# Altium PCB FPGA_Peripheral_Board.PcbDoc (part 1 of 5)
Units mm, origin at the board's own origin, x right, y up, seen from the top; angles counter-clockwise.
Board outline 78.8 x 69 mm, 4 copper layers (Top Layer, Int1 (GND), Int2 (PWR), Bottom Layer), stack 1.508 mm thick; 111 components, 280 nets, 1262 pads, 728 vias.
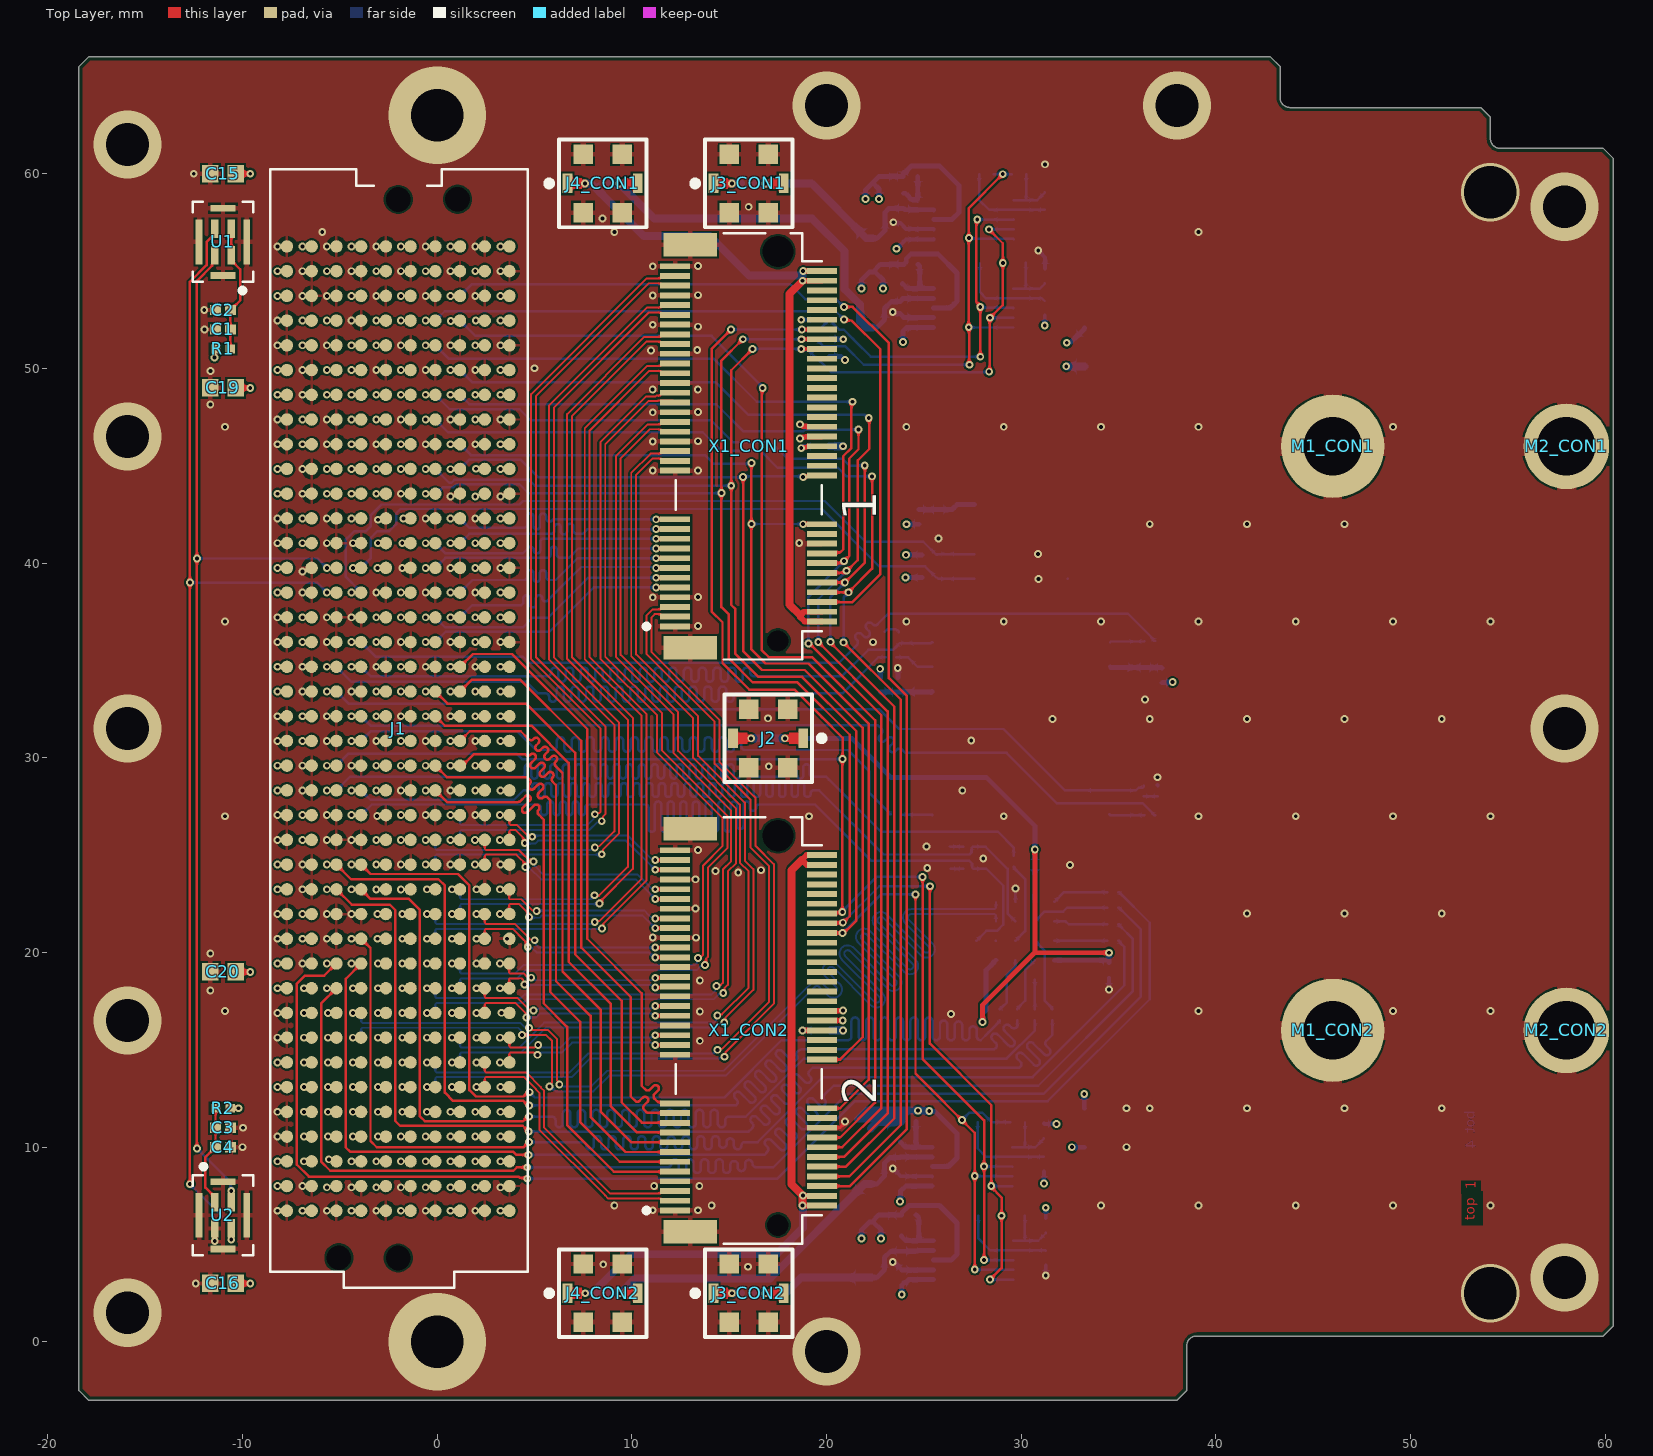
[diagram p0: Top Layer view]
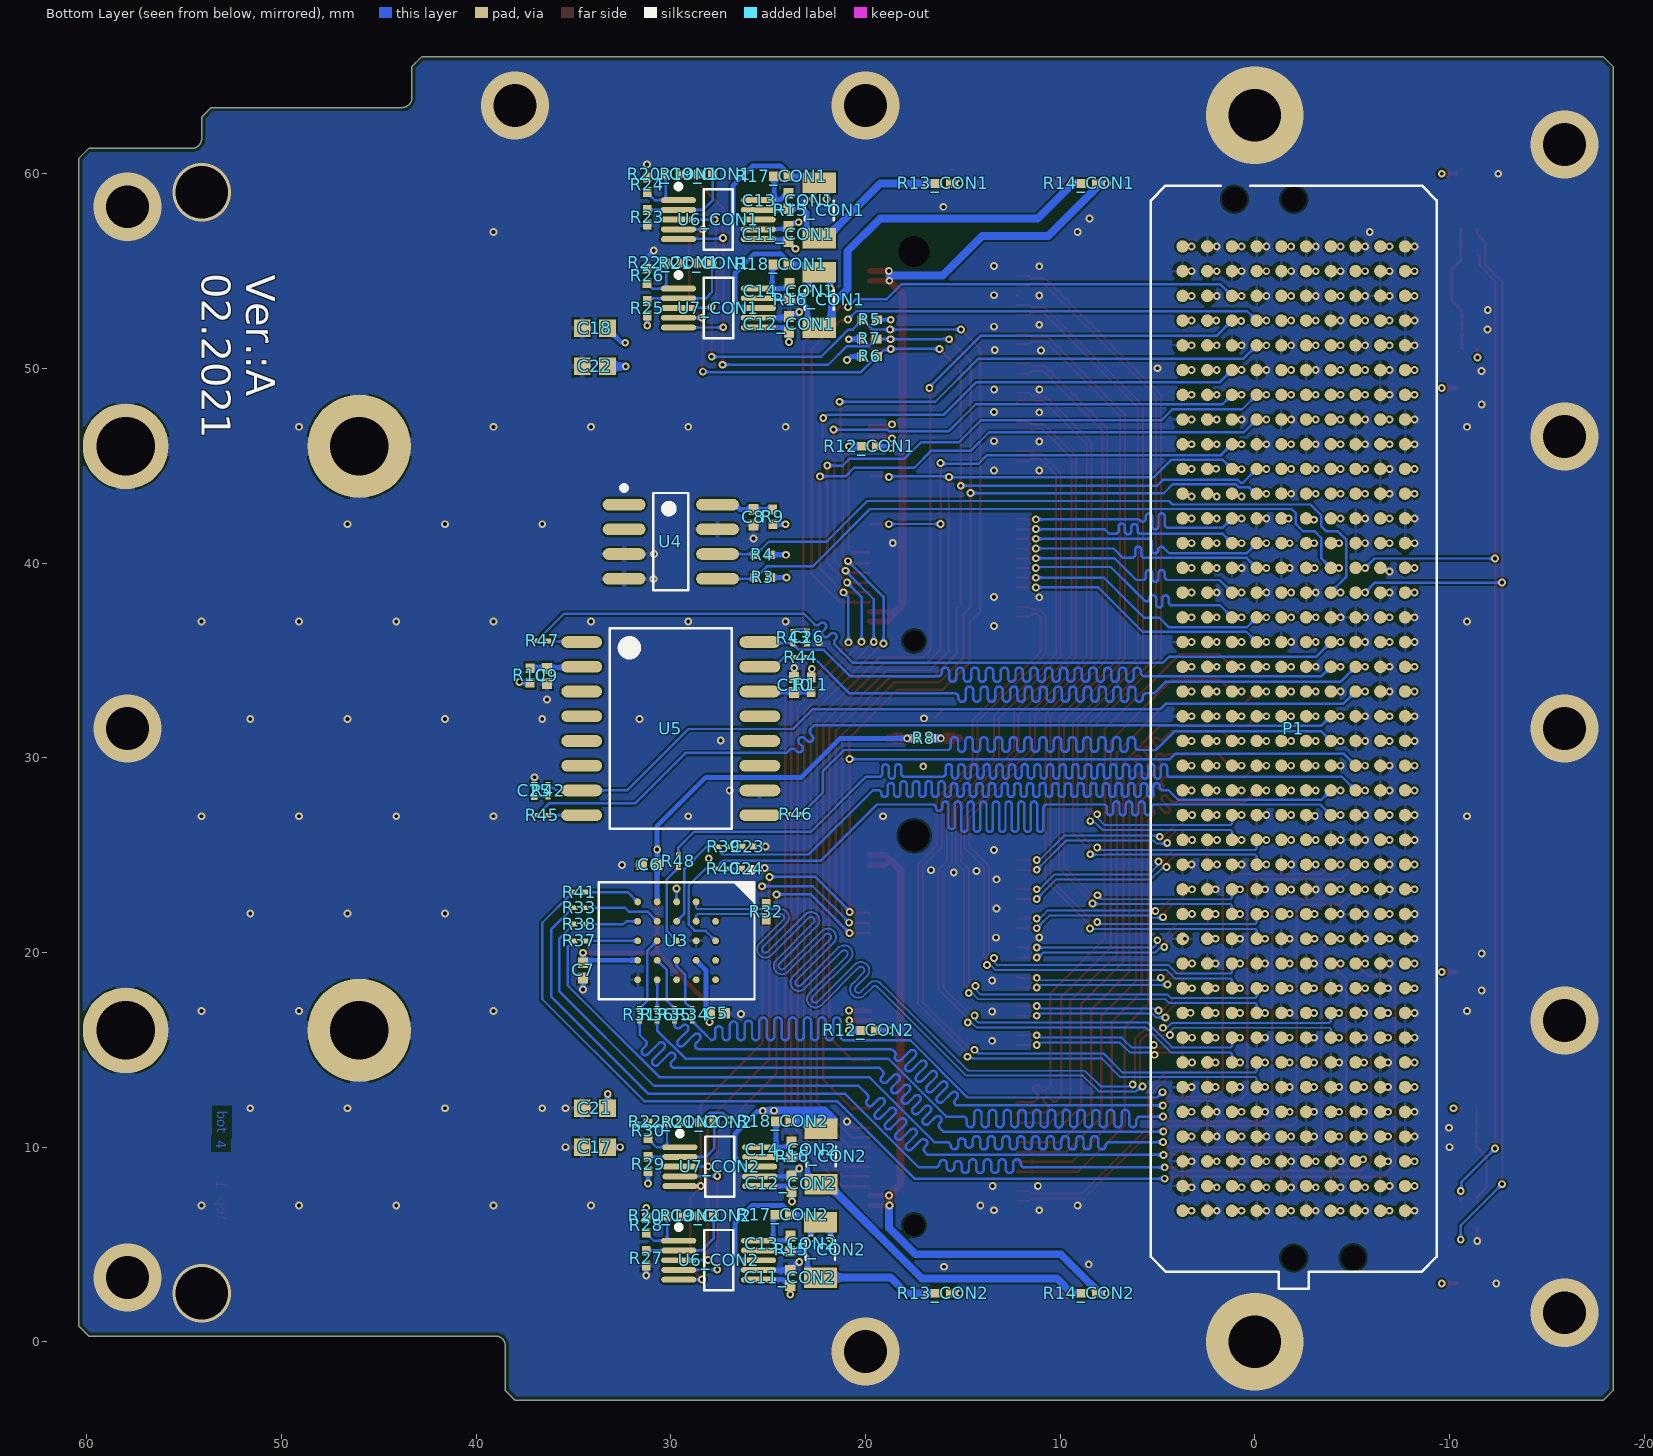
[diagram p1: Bottom Layer view, seen from below]
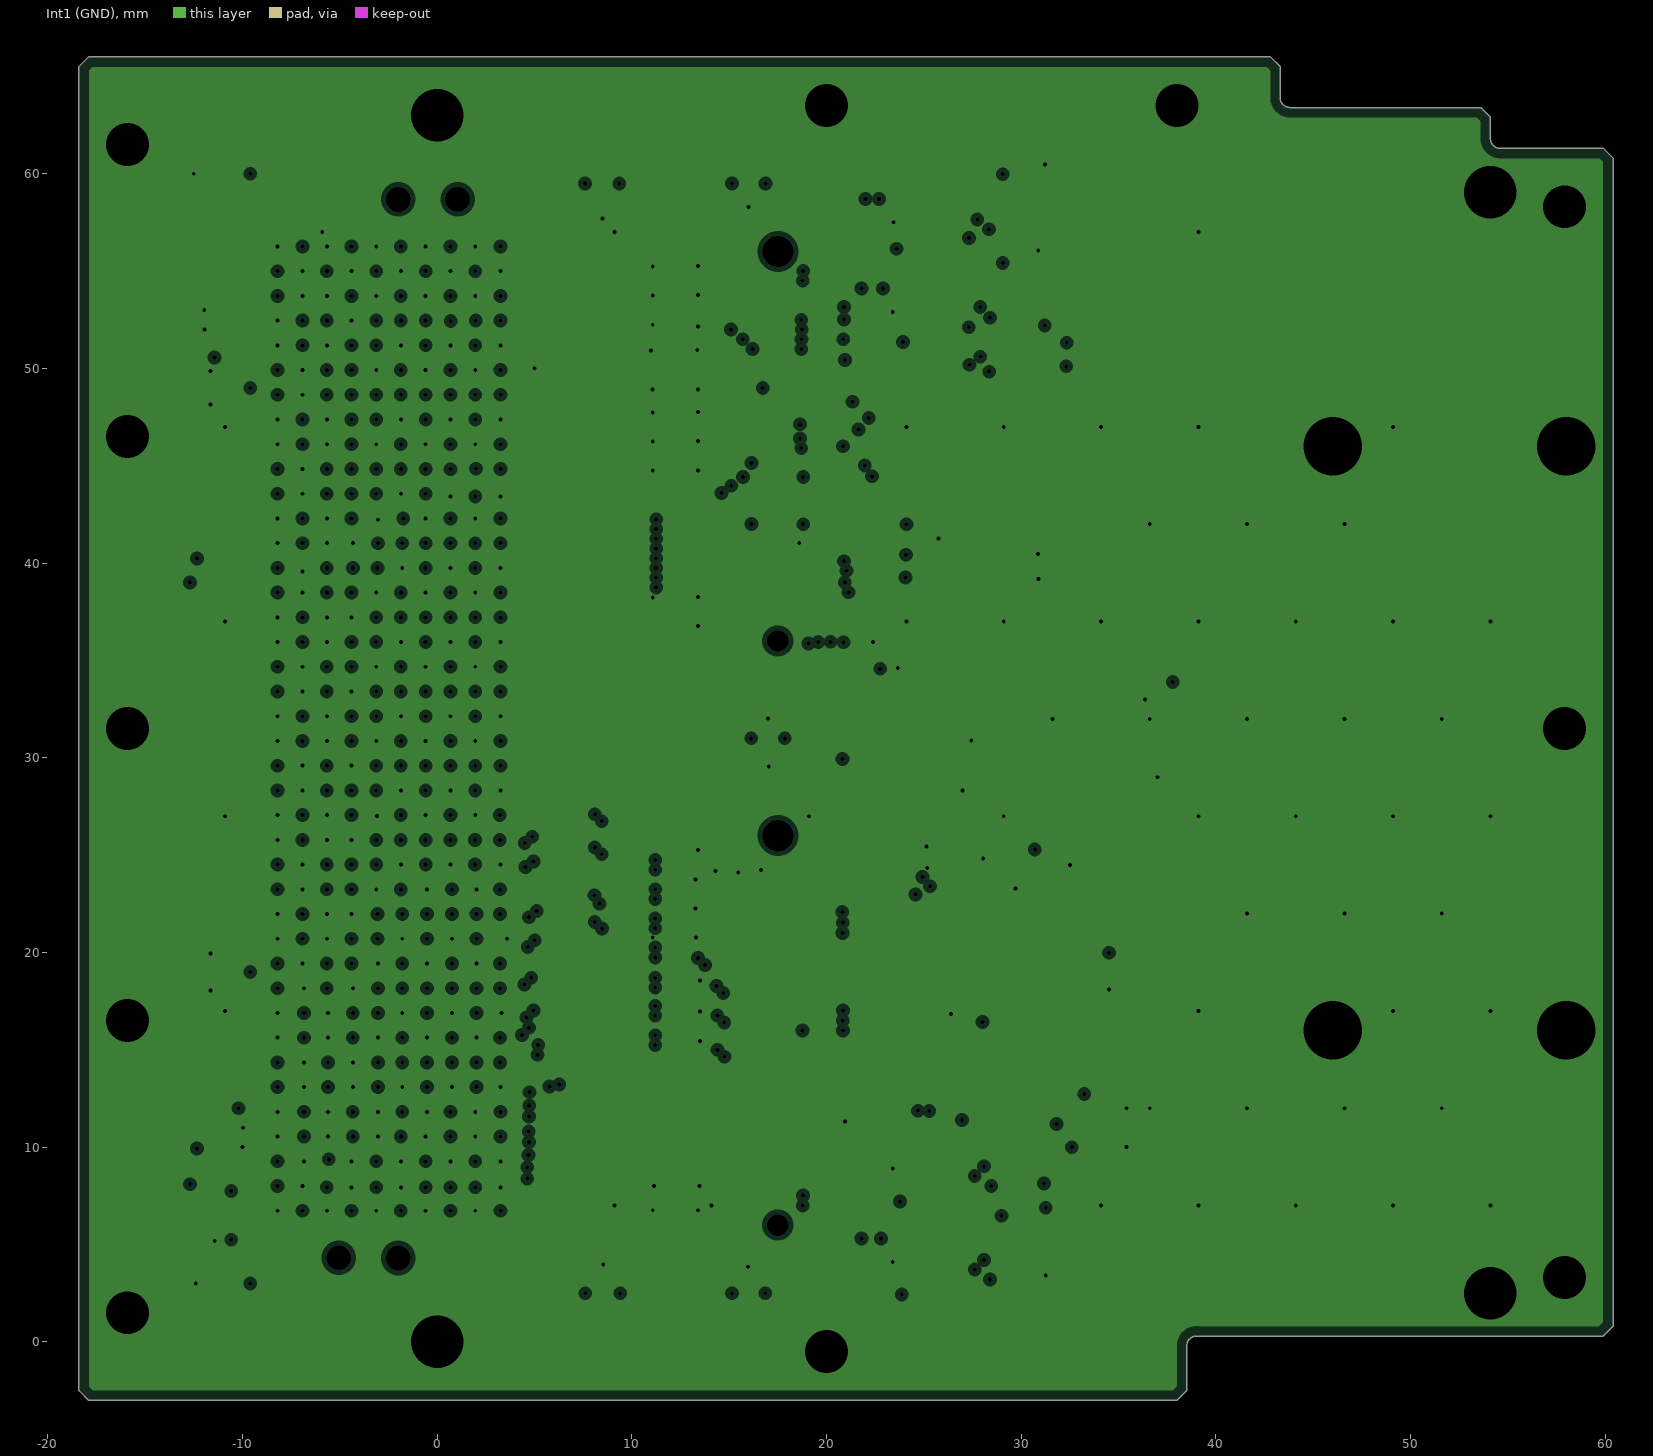
[diagram p2: Int1 (GND), clearances drawn from the general rule]
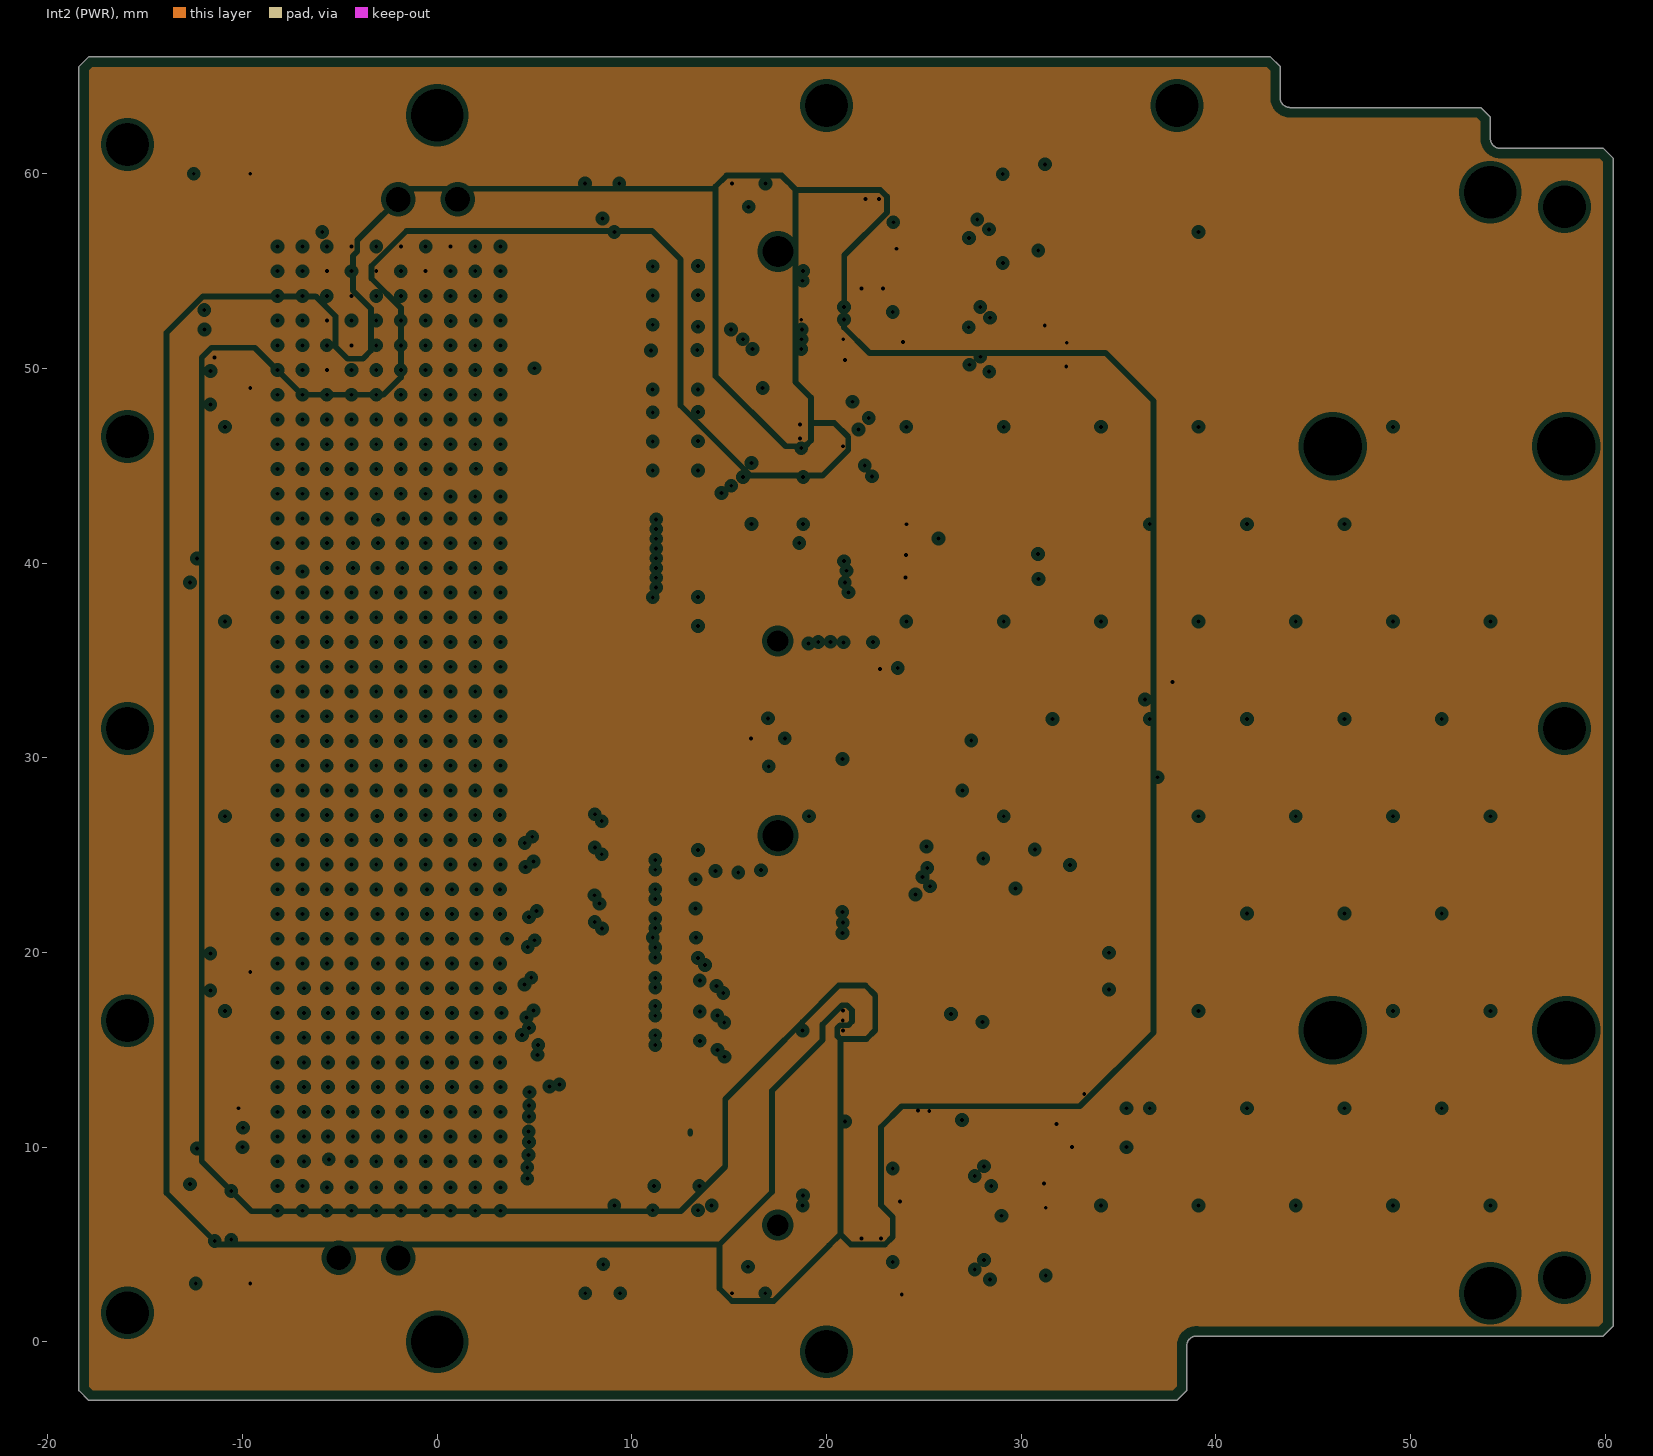
[diagram p3: Int2 (PWR), clearances drawn from the general rule]
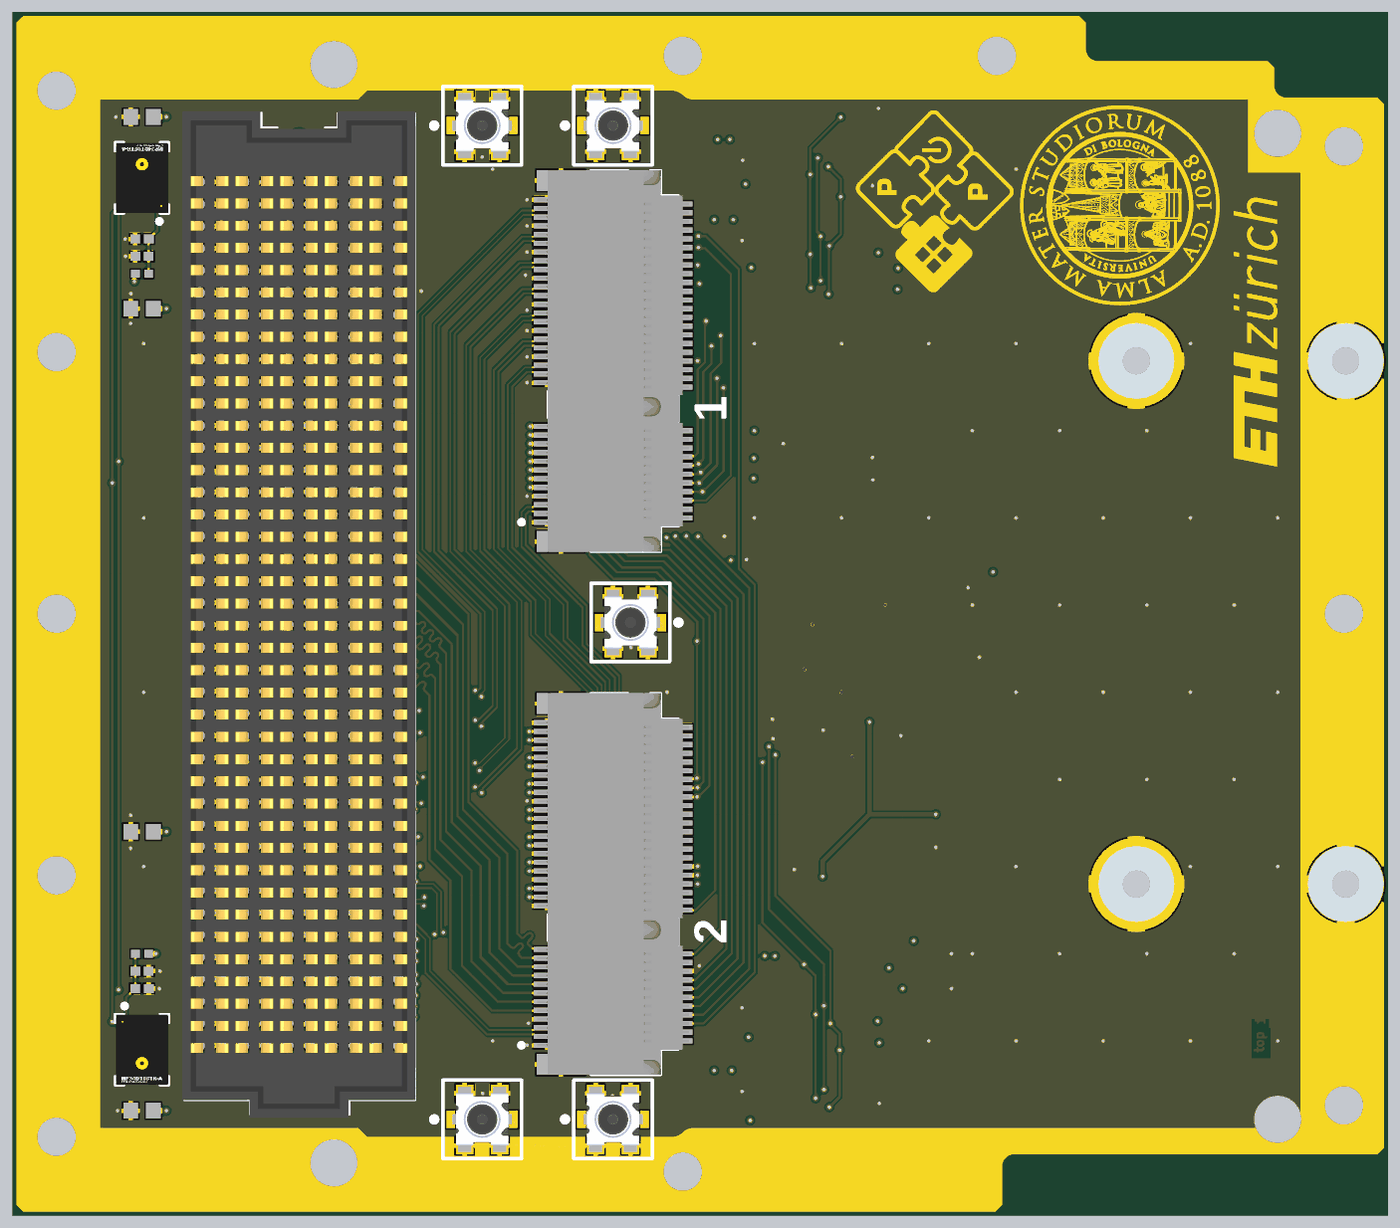
[diagram p7: 3D render of the assembled board from above, using the file's embedded part models]

## Layer stack, top to bottom
Top Solder: solder mask 0.0254, SM-001, Dk 4
Top Layer: signal copper 0.035
Dielectric 2: prepreg 0.0838, PP-009, Dk 4
Int1 (GND): plane copper 0.035, net GND
Dielectric 3: core 1.2, Core-043, Dk 4.3
Int2 (PWR): plane copper 0.035, net (Multiple Nets)
Dielectric 4: prepreg 0.0838, PP-009, Dk 4
Bottom Layer: signal copper 0.035
Bottom Solder: solder mask 0.0254, SM-001, Dk 4

## Board outline
-17.9,-3 -18.4,-2.5 -18.4,65.5 -17.9,66 42.8,66 43.3,65.5 43.3,63.9 ccw(c43.8,63.9) 43.8,63.4 53.6,63.4 54.1,62.9 54.1,61.8 ccw(c54.6,61.8) 54.6,61.3 59.9,61.3 60.4,60.8 60.4,0.8 59.895,0.295 39,0.3 ccw(c39,-0.2) 38.5,-0.2 38.5,-2.5 38,-3

## Design rules (kind name [scope] priority, off if disabled: settings)
BoardOutlineClearance [All] p1: gap=0.2 ignorepadtopadclearanceinfootprint=FALSE
Clearance [All] p1: gap=0.1 ignorepadtopadclearanceinfootprint=FALSE
DiffPairsRouting DiffPairsRouting_Hyper [InDifferentialPair('HYPER_CK')] p1: maxlimit=0.15 minlimit=0.15 mostfreqgap=0.15 toplayer_minwidth=0.1 toplayer_maxwidth=0.1 toplayer_prefwidth=0.1 bottomlayer_minwidth=0.1 bottomlayer_maxwidth=0.1 bottomlayer_prefwidth=0.1 impedanceprofiledriven=TRUE impedanceprofileid={B9DEDC51-EA28-49EF-AFAD-D0C3E7C7F371} impedanceprofilevalue=100.000000 maxuncoupledlength=12.7
DiffPairsRouting DiffPairsRouting_MPP_D [InDifferentialPairClass('All Differential Pairs')] p2: maxlimit=0.15 minlimit=0.15 mostfreqgap=0.15 toplayer_minwidth=0.1 toplayer_maxwidth=0.1 toplayer_prefwidth=0.1 bottomlayer_minwidth=0.1 bottomlayer_maxwidth=0.1 bottomlayer_prefwidth=0.1 impedanceprofiledriven=TRUE impedanceprofileid={B9DEDC51-EA28-49EF-AFAD-D0C3E7C7F371} impedanceprofilevalue=100.000000 maxuncoupledlength=12.7
DiffPairsRouting [InDifferentialPair('No Differential Pair')] p3: maxlimit=0.15 minlimit=0.15 mostfreqgap=0.15 toplayer_minwidth=0.1 toplayer_maxwidth=0.1 toplayer_prefwidth=0.1 bottomlayer_minwidth=0.1 bottomlayer_maxwidth=0.1 bottomlayer_prefwidth=0.1 impedanceprofiledriven=TRUE impedanceprofileid={B9DEDC51-EA28-49EF-AFAD-D0C3E7C7F371} impedanceprofilevalue=100.000000 maxuncoupledlength=12.7
HoleSize [All] p1: absolutevalues=TRUE maxlimit=4 minlimit=0.025 maxpercent=80.000 minpercent=20.000
MatchedLengths MatchedLengths_CON1_S [InNetClass('CON2_GP_S[0..7]')] p1: tolerance=25.4 checknetsindiffpair=FALSE checkdiffpairvsdiffpair=TRUE checkxsignals=TRUE checkothers=TRUE usedelayunits=TRUE delaytolerance=5.000000
MatchedLengths MatchedLengths_CON1_D [InNetClass('CON1_GP_D_N[0..7]')] p2: tolerance=25.4 checknetsindiffpair=FALSE checkdiffpairvsdiffpair=TRUE checkxsignals=TRUE checkothers=TRUE usedelayunits=TRUE delaytolerance=50.000000
MatchedLengths MatchedLengths_CON2_D [InNetClass('CON2_GP_D_N[0..7]')] p3: tolerance=25.4 checknetsindiffpair=FALSE checkdiffpairvsdiffpair=TRUE checkxsignals=TRUE checkothers=TRUE usedelayunits=TRUE delaytolerance=50.000000
MatchedLengths MatchedLengths_CON1_S_1 [InNetClass('CON1_GP_S[0..7]')] p4: tolerance=25.4 checknetsindiffpair=FALSE checkdiffpairvsdiffpair=TRUE checkxsignals=TRUE checkothers=TRUE usedelayunits=TRUE delaytolerance=5.000000
MatchedLengths MatchedLengths_Hyper [InNetClass('Hyper')] p5: tolerance=5 checknetsindiffpair=FALSE checkdiffpairvsdiffpair=TRUE checkxsignals=TRUE checkothers=TRUE usedelayunits=TRUE delaytolerance=50.000000
MatchedLengths MatchedLengths_QSPI [InNetClass('QSPI0')] p6: tolerance=10 checknetsindiffpair=FALSE checkdiffpairvsdiffpair=TRUE checkxsignals=TRUE checkothers=TRUE usedelayunits=TRUE delaytolerance=100.000000
MinimumSolderMaskSliver [All] p1: minsoldermaskwidth=0.1
PlaneClearance [All] p1: clearance=0.254
PlaneConnect [All] p1: pad.planeconnectstyle=Relief pad.reliefexpansion=0.125 pad.reliefentries=4 pad.reliefconductorwidth=0.125 pad.reliefairgap=0.125 via.planeconnectstyle=Direct via.reliefexpansion=0.508 via.reliefentries=4 via.reliefconductorwidth=0.254 via.reliefairgap=0.254
PolygonConnect PolygonConnect_GND_FMC [HasFootprint('BTB-SM1-27-2V400F')] p1: connectstyle=Relief reliefconductorwidth=0.15 reliefentries=4 polygonreliefangle="90 Angle" airgapwidth=0.2
PolygonConnect PolygonConnect_GND_FMC_1 [HasFootprint('BTB-SM1-27-2V400M')] p2: connectstyle=Relief reliefconductorwidth=0.15 reliefentries=4 polygonreliefangle="90 Angle" airgapwidth=0.2
PolygonConnect PolygonConnect_GND_FMC_2 [HasFootprint('FBGA24_A-130')] p3: connectstyle=Relief reliefconductorwidth=0.15 reliefentries=4 polygonreliefangle="90 Angle" airgapwidth=0.2
PolygonConnect PolygonConnect_GND [InNet('GND')] p4: thpad.connectstyle=Relief thpad.reliefconductorwidth=1 thpad.reliefentries=4 thpad.polygonreliefangle="90 Angle" thpad.airgapwidth=0.1 smdpad.connectstyle=Relief smdpad.reliefconductorwidth=0.254 smdpad.reliefentries=4 smdpad.polygonreliefangle="90 Angle" smdpad.airgapwidth=0.1 via.connectstyle=Direct via.reliefconductorwidth=0.254 via.reliefentries=4 via.polygonreliefangle="90 Angle" via.airgapwidth=0.254
PolygonConnect [All] p5: connectstyle=Relief reliefconductorwidth=0.254 reliefentries=4 polygonreliefangle="90 Angle" airgapwidth=0.254
RoutingVias [All] p1: holewidth=0.2 width=0.4 viastyle="Through Hole" minholewidth=0.2 minwidth=0.4 maxholewidth=3 maxwidth=6
SilkToSilkClearance [All] p1: silktosilkclearance=0.15
SilkToSolderMaskClearance [IsPad] p1: minsilkscreentomaskgap=0 clearancetoexposedcopper=TRUE
SolderMaskExpansion [All] p1: expansion=0.102 istentingtop=FALSE
Width Width_50R_CON1 [InNetClass('S_FMC_MPP_CON1')] p1: maxlimit=0.125 minlimit=0.125 preferedwidth=0.125 impedanceprofiledriven=TRUE impedanceprofileid={FCD363CF-F7B2-4878-A8FD-48319899D079} impedanceprofilevalue=50.000000 minimp=50.000000 maximp=50.000000 favimp=50.000000
Width Width_50R_CON2 [InNetClass('S_FMC_MPP_CON2')] p2: maxlimit=0.125 minlimit=0.125 preferedwidth=0.125 impedanceprofiledriven=TRUE impedanceprofileid={FCD363CF-F7B2-4878-A8FD-48319899D079} impedanceprofilevalue=50.000000 minimp=50.000000 maximp=50.000000 favimp=50.000000
Width [All] p3: maxlimit=5 minlimit=0.1 preferedwidth=0.15
23 further rules are at their usual default settings.

## Classes and differential pairs
net class DIFFPAIR_Hyper: HYPER_CK_N HYPER_CK_P
component class FPGA_main: C15 C16 C17 C18 C19 C20 C21 C22 R23 R24 R25 R26 R27 R28 R29 R30
net class S_FMC_MPP_CON2: CON2_GP_S0 CON2_GP_S1 CON2_GP_S2 CON2_GP_S3 CON2_GP_S4 CON2_GP_S5 CON2_GP_S6 CON2_GP_S7
net class S_FMC_MPP_CON1: CON1_GP_S0 CON1_GP_S1 CON1_GP_S2 CON1_GP_S3 CON1_GP_S4 CON1_GP_S5 CON1_GP_S6 CON1_GP_S7
net class CON2_GP_D_P[0..7]: CON2_GP_D_P0 CON2_GP_D_P1 CON2_GP_D_P2 CON2_GP_D_P3 CON2_GP_D_P4 CON2_GP_D_P5 CON2_GP_D_P6 CON2_GP_D_P7
net class CON2_GP_D_N[0..7]: CON2_GP_D_N0 CON2_GP_D_N1 CON2_GP_D_N2 CON2_GP_D_N3 CON2_GP_D_N4 CON2_GP_D_N5 CON2_GP_D_N6 CON2_GP_D_N7
net class CON1_GP_D_P[0..7]: CON1_GP_D_P0 CON1_GP_D_P1 CON1_GP_D_P2 CON1_GP_D_P3 CON1_GP_D_P4 CON1_GP_D_P5 CON1_GP_D_P6 CON1_GP_D_P7
net class CON1_GP_D_N[0..7]: CON1_GP_D_N0 CON1_GP_D_N1 CON1_GP_D_N2 CON1_GP_D_N3 CON1_GP_D_N4 CON1_GP_D_N5 CON1_GP_D_N6 CON1_GP_D_N7
net class CON2_GP_S[0..7]: CON2_GP_S0 CON2_GP_S1 CON2_GP_S2 CON2_GP_S3 CON2_GP_S4 CON2_GP_S5 CON2_GP_S6 CON2_GP_S7
net class CON1_GP_S[0..7]: CON1_GP_S0 CON1_GP_S1 CON1_GP_S2 CON1_GP_S3 CON1_GP_S4 CON1_GP_S5 CON1_GP_S6 CON1_GP_S7
channel class MPP_M2_extension: CON1 CON2
net class QSPI_IO[0..3]: QSPI_IO0 QSPI_IO1 QSPI_IO2 QSPI_IO3
net class QSPI0: QSPI_IO0 QSPI_IO1 QSPI_IO2 QSPI_IO3 QSPI_nCS QSPI_SCK
net class Hyper: HYPER_CK_N HYPER_CK_P HYPER_CSN0 HYPER_CSN1 HYPER_D0 HYPER_D1 HYPER_D2 HYPER_D3 HYPER_D4 HYPER_D5 HYPER_D6 HYPER_D7 HYPER_RWDS
net class HYPER_D[0..7]: HYPER_D0 HYPER_D1 HYPER_D2 HYPER_D3 HYPER_D4 HYPER_D5 HYPER_D6 HYPER_D7
net class HYPER_CSN[0..1]: HYPER_CSN0 HYPER_CSN1
net class DP_FMC_MPP_CON1: CON1_GP_D_N0 CON1_GP_D_N1 CON1_GP_D_N2 CON1_GP_D_N3 CON1_GP_D_N4 CON1_GP_D_N5 CON1_GP_D_N6 CON1_GP_D_N7 CON1_GP_D_P0 CON1_GP_D_P1 CON1_GP_D_P2 CON1_GP_D_P3 CON1_GP_D_P4 CON1_GP_D_P5 CON1_GP_D_P6 CON1_GP_D_P7 CON2_GP_D_N0 CON2_GP_D_N1 CON2_GP_D_N2 CON2_GP_D_N3 CON2_GP_D_N4 CON2_GP_D_N5 CON2_GP_D_N6 CON2_GP_D_N7 CON2_GP_D_P0 CON2_GP_D_P1 CON2_GP_D_P2 CON2_GP_D_P3 CON2_GP_D_P4 CON2_GP_D_P5 CON2_GP_D_P6 CON2_GP_D_P7
component class QSPI: C9 C10 C25 C26 R10 R11 R42 R43 R44 R45 R46 R47 U5
component class I2S: C1 C2 C3 C4 R1 R2 U1 U2
component class I2C: C8 R9 U4
component class HYPER: C5 C6 C7 C23 C24 J2 R8 R31 R32 R33 R34 R35 R36 R37 R38 R39 R40 R41 R48 U3
component class FMC: J1 P1 R3 R4 R5 R6 R7
component class CON2: C11_CON2 C12_CON2 C13_CON2 C14_CON2 J3_CON2 J4_CON2 M1_CON2 M2_CON2 R12_CON2 R13_CON2 R14_CON2 R15_CON2 R16_CON2 R17_CON2 R18_CON2 R19_CON2 R20_CON2 R21_CON2 R22_CON2 U6_CON2 U7_CON2 X1_CON2
component class CON1: C11_CON1 C12_CON1 C13_CON1 C14_CON1 J3_CON1 J4_CON1 M1_CON1 M2_CON1 R12_CON1 R13_CON1 R14_CON1 R15_CON1 R16_CON1 R17_CON1 R18_CON1 R19_CON1 R20_CON1 R21_CON1 R22_CON1 U6_CON1 U7_CON1 X1_CON1
differential pair HYPER_CK: +HYPER_CK_P -HYPER_CK_N
differential pair CON2_GP_D7: +CON2_GP_D_P7 -CON2_GP_D_N7
differential pair CON2_GP_D6: +CON2_GP_D_P6 -CON2_GP_D_N6
differential pair CON2_GP_D5: +CON2_GP_D_P5 -CON2_GP_D_N5
differential pair CON2_GP_D4: +CON2_GP_D_P4 -CON2_GP_D_N4
differential pair CON2_GP_D3: +CON2_GP_D_P3 -CON2_GP_D_N3
differential pair CON2_GP_D2: +CON2_GP_D_P2 -CON2_GP_D_N2
differential pair CON2_GP_D1: +CON2_GP_D_P1 -CON2_GP_D_N1
differential pair CON2_GP_D0: +CON2_GP_D_P0 -CON2_GP_D_N0
differential pair CON1_GP_D7: +CON1_GP_D_P7 -CON1_GP_D_N7
differential pair CON1_GP_D6: +CON1_GP_D_P6 -CON1_GP_D_N6
differential pair CON1_GP_D5: +CON1_GP_D_P5 -CON1_GP_D_N5
differential pair CON1_GP_D4: +CON1_GP_D_P4 -CON1_GP_D_N4
differential pair CON1_GP_D3: +CON1_GP_D_P3 -CON1_GP_D_N3
differential pair CON1_GP_D2: +CON1_GP_D_P2 -CON1_GP_D_N2
differential pair CON1_GP_D1: +CON1_GP_D_P1 -CON1_GP_D_N1
differential pair CON1_GP_D0: +CON1_GP_D_P0 -CON1_GP_D_N0

## Components (designator, comment, footprint, x,y, rotation, side; value= is the part's Value field where it differs from the comment)
C1 "1uF" CAPC1005X60X30LL05T10 -11,52 r0 top
C2 "100nF" CAPC1050X55X23LL05T13 -11,53 r0 top
C3 "1uF" CAPC1005X60X30LL05T10 -11,11 r180 top
C4 "100nF" CAPC1050X55X23LL05T13 -11,10 r180 top
C5 "100nF" CAPC1050X55X23LL05T13 27.626,16.881 r0 bottom
C6 "100nF" CAPC1050X55X23LL05T13 31.1,24.5 r180 bottom
C7 "100nF" CAPC1050X55X23LL05T13 34.502,19.083 r90 bottom
C8 "100nF" CAPC1050X55X23LL05T13 25.758,42.357 r90 bottom
C9 "100nF" CAPC1050X55X23LL05T13 36.358,34.205 r90 bottom
C10 "100nF" CAPC1050X55X23LL05T13 23.665,33.735 r270 bottom
C11_CON1 "100nF" CAPC1050X55X23LL05T13 23.96,56.901 r270 bottom (schematic designator C11)
C11_CON2 "100nF" CAPC1050X55X23LL05T13 23.863,3.289 r270 bottom (schematic designator C11)
C12_CON1 "100nF" CAPC1050X55X23LL05T13 23.922,52.269 r270 bottom (schematic designator C12)
C12_CON2 "100nF" CAPC1050X55X23LL05T13 23.803,8.124 r270 bottom (schematic designator C12)
C13_CON1 "100nF" CAPC1050X55X23LL05T13 23.954,58.606 r90 bottom (schematic designator C13)
C13_CON2 "100nF" CAPC1050X55X23LL05T13 23.847,5.046 r90 bottom (schematic designator C13)
C14_CON1 "100nF" CAPC1050X55X23LL05T13 23.907,53.975 r90 bottom (schematic designator C14)
C14_CON2 "100nF" CAPC1050X55X23LL05T13 23.803,9.879 r90 bottom (schematic designator C14)
C15 "10uF" CAPC1608X90X35LL15T15 -11,60 r0 top
C16 "10uF" CAPC1608X90X35LL15T15 -11,3 r0 top
C17 "10uF" CAPC1608X90X35LL15T15 33.9,10 r180 bottom
C18 "10uF" CAPC1608X90X35LL15T15 33.9,52.069 r180 bottom
C19 "10uF" CAPC1608X90X35LL15T15 -11,49 r0 top
C20 "10uF" CAPC1608X90X35LL15T15 -11,19 r0 top
C21 "10uF" CAPC1608X90X35LL15T15 33.9,12 r180 bottom
C22 "10uF" CAPC1608X90X35LL15T15 33.9,50.1 r180 bottom
C23 "100pF" CAPC0603X33X15LL03T05 26.058,25.443 r180 bottom
C24 "100pF" CAPC0603X33X15LL03T05 26.1,24.3 r180 bottom
C25 "100pF" CAPC0603X33X15LL03T05 37.011,28.301 r90 bottom
C26 "100pF" CAPC0603X33X15LL03T05 22.997,36.181 r270 bottom
J1 "ASP-134486-01" BTB-SM1-27-2V400F -2,31.5 r270 top locked
J2 "MM8430-2610" MM8430-2610 17,31 r180 top
J3_CON1 "MM8430-2610" MM8430-2610 16,59.5 r0 top (schematic designator J3)
J3_CON2 "MM8430-2610" MM8430-2610 16,2.5 r0 top (schematic designator J3)
J4_CON1 "MM8430-2610" MM8430-2610 8.5,59.5 r0 top (schematic designator J4)
J4_CON2 "MM8430-2610" MM8430-2610 8.5,2.5 r0 top (schematic designator J4)
M1_CON1 "DNM" 9774015243R#1 46,46 r90 top (schematic designator M1)
M1_CON2 "DNM" 9774015243R#1 46,16 r90 top (schematic designator M1)
M2_CON1 "9774015243R" 9774015243R#2 58,46 r90 top (schematic designator M2)
M2_CON2 "9774015243R" 9774015243R#2 58,16 r90 top (schematic designator M2)
P1 "ASP-134488-01" BTB-SM1-27-2V400M -2,31.5 r270 bottom
R1 "0R" RESC1005X40X25LL05T10 -11,51 r180 top value="0 Ohm"
R2 "0R" RESC1005X40X25LL05T10 -11,12 r0 top value="0 Ohm"
R3 "2k2" RESC1005X40X25LL05T10 25.282,39.262 r180 bottom value="2.2 kOhm"
R4 "2k2" RESC1005X40X25LL05T10 25.291,40.425 r180 bottom value="2.2 kOhm"
R5 "2k2" RESC1005X40X25LL05T10 19.779,52.494 r180 bottom value="2.2 kOhm"
R6 "2k2" RESC1005X40X25LL05T10 19.785,50.614 r0 bottom value="2.2 kOhm"
R7 "10k" RESC1005X40X25LL05T10 19.812,51.515 r0 bottom value="10 kOhm"
R8 "DNM" RESC1005X40X25LL05T10 17,31 r180 bottom value="0 Ohm"
R9 "0R" RESC1005X40X25LL05T10 24.757,42.373 r270 bottom value="0 Ohm"
R10 "0R" RESC1005X40X25LL05T10 37.235,34.229 r270 bottom value="0 Ohm"
R11 "0R" RESC1005X40X25LL05T10 22.78,33.748 r90 bottom value="0 Ohm"
R12_CON1 "0R" RESC1005X40X25LL05T10 19.784,46 r0 bottom value="0 Ohm" (schematic designator R12)
R12_CON2 "0R" RESC1005X40X25LL05T10 19.83,16 r0 bottom value="0 Ohm" (schematic designator R12)
R13_CON1 "DNM" RESC1005X40X25LL05T10 16,59.5 r0 bottom value="0 Ohm" (schematic designator R13)
R13_CON2 "DNM" RESC1005X40X25LL05T10 16,2.5 r0 bottom value="0 Ohm" (schematic designator R13)
R14_CON1 "DNM" RESC1005X40X25LL05T10 8.5,59.5 r0 bottom value="0 Ohm" (schematic designator R14)
R14_CON2 "DNM" RESC1005X40X25LL05T10 8.5,2.5 r0 bottom value="0 Ohm" (schematic designator R14)
R15_CON1 "10mR" RESC3116X65X40NL10T20 22.373,58.111 r270 bottom value="10 mOhm" (schematic designator R15)
R15_CON2 "10mR" RESC3116X65X40NL10T20 22.315,4.729 r270 bottom value="10 mOhm" (schematic designator R15)
R16_CON1 "10mR" RESC3116X65X40NL10T20 22.374,53.522 r270 bottom value="10 mOhm" (schematic designator R16)
R16_CON2 "10mR" RESC3116X65X40NL10T20 22.278,9.532 r270 bottom value="10 mOhm" (schematic designator R16)
R17_CON1 "10R" RESC1005X40X25LL10T10 24.31,59.864 r180 bottom value="10 Ohm" (schematic designator R17)
R17_CON2 "10R" RESC1005X40X25LL10T10 24.227,6.524 r180 bottom value="10 Ohm" (schematic designator R17)
R18_CON1 "10R" RESC1005X40X25LL10T10 24.323,55.342 r180 bottom value="10 Ohm" (schematic designator R18)
R18_CON2 "10R" RESC1005X40X25LL10T10 24.214,11.326 r180 bottom value="10 Ohm" (schematic designator R18)
R19_CON1 "DNM" RESC1005X40X25LL05T10 28.215,59.982 r180 bottom value="0 Ohm" (schematic designator R19)
R19_CON2 "DNM" RESC1005X40X25LL05T10 28.172,6.476 r180 bottom value="0 Ohm" (schematic designator R19)
R20_CON1 "DNM" RESC1005X40X25LL05T10 29.884,59.976 r0 bottom value="0 Ohm" (schematic designator R20)
R20_CON2 "DNM" RESC1005X40X25LL05T10 29.817,6.472 r0 bottom value="0 Ohm" (schematic designator R20)
R21_CON1 "DNM" RESC1005X40X25LL05T10 28.256,55.413 r180 bottom value="0 Ohm" (schematic designator R21)
R21_CON2 "DNM" RESC1005X40X25LL05T10 28.133,11.287 r180 bottom value="0 Ohm" (schematic designator R21)
R22_CON1 "DNM" RESC1005X40X25LL05T10 29.859,55.42 r0 bottom value="0 Ohm" (schematic designator R22)
R22_CON2 "DNM" RESC1005X40X25LL05T10 29.819,11.294 r0 bottom value="0 Ohm" (schematic designator R22)
R23 "0R" RESC1005X40X25LL05T10 31.214,57.762 r90 bottom value="0 Ohm"
R24 "0R" RESC1005X40X25LL05T10 31.214,59.433 r270 bottom value="0 Ohm"
R25 "0R" RESC1005X40X25LL05T10 31.206,53.087 r90 bottom value="0 Ohm"
R26 "0R" RESC1005X40X25LL05T10 31.215,54.75 r270 bottom value="0 Ohm"
R27 "0R" RESC1005X40X25LL05T10 31.262,4.303 r90 bottom value="0 Ohm"
R28 "0R" RESC1005X40X25LL05T10 31.262,5.983 r270 bottom value="0 Ohm"
R29 "0R" RESC1005X40X25LL05T10 31.166,9.137 r90 bottom value="0 Ohm"
R30 "0R" RESC1005X40X25LL05T10 31.166,10.84 r270 bottom value="0 Ohm"
R31 "49.9R" RESC0603X26X15LL03T05 31.6,16.8 r90 bottom value="49.9 Ohm"
R32 "100R" RESC0603X28X15ML05T05 25.1,22.1 r270 bottom value="100 Ohm"
R33 "49.9R" RESC0603X26X15LL03T05 34.7,22.3 r180 bottom value="49.9 Ohm"
R34 "49.9R" RESC0603X26X15LL03T05 28.9,16.8 r90 bottom value="49.9 Ohm"
R35 "49.9R" RESC0603X26X15LL03T05 29.8,16.8 r90 bottom value="49.9 Ohm"
R36 "49.9R" RESC0603X26X15LL03T05 30.7,16.8 r90 bottom value="49.9 Ohm"
R37 "49.9R" RESC0603X26X15LL03T05 34.7,20.6 r180 bottom value="49.9 Ohm"
R38 "49.9R" RESC0603X26X15LL03T05 34.695,21.461 r180 bottom value="49.9 Ohm"
R39 "49.9R" RESC0603X26X15LL03T05 27.289,25.433 r180 bottom value="49.9 Ohm"
R40 "49.9R" RESC0603X26X15LL03T05 27.3,24.3 r180 bottom value="49.9 Ohm"
R41 "49.9R" RESC0603X26X15LL03T05 34.7,23.1 r180 bottom value="49.9 Ohm"
R42 "49.9R" RESC0603X26X15LL03T05 36.3,28.3 r270 bottom value="49.9 Ohm"
R43 "49.9R" RESC0603X26X15LL03T05 23.715,36.174 r90 bottom value="49.9 Ohm"
R44 "49.9R" RESC0603X26X15LL03T05 23.311,35.162 r180 bottom value="49.9 Ohm"
R45 "49.9R" RESC0603X26X15LL03T05 36.6,27.052 r0 bottom value="49.9 Ohm"
R46 "49.9R" RESC0603X26X15LL03T05 23.575,27.1 r180 bottom value="49.9 Ohm"
R47 "49.9R" RESC0603X26X15LL03T05 36.6,36 r0 bottom value="49.9 Ohm"
R48 "49.9R" RESC0603X26X15LL03T05 29.607,24.689 r270 bottom value="49.9 Ohm"
U1 "MP34DT05TR-A" FP-HCLGA-DM00231908-MFG -11,56.5 r180 top
U2 "MP34DT05TR-A" FP-HCLGA-DM00231908-MFG -11,6.5 r0 top
U3 "S71KS512SC0" FBGA24_A-130 29.7,20.6 r270 bottom
U4 "M24M02-DRMN6TP" M08A_N 30,41.1 r180 bottom
U5 "S25FL256SAGMFIR03" SOIC127P1030X265-16N 30,31.5 r180 bottom
U6_CON1 "INA233AIDGSR" ADI-RM-10_N 27.556,57.643 r180 bottom (schematic designator U6)
U6_CON2 "INA233AIDGSR" ADI-RM-10_N 27.542,4.197 r180 bottom (schematic designator U6)
U7_CON1 "INA233AIDGSR" ADI-RM-10_N 27.55,53.1 r180 bottom (schematic designator U7)
U7_CON2 "INA233AIDGSR" ADI-RM-10_N 27.482,9 r180 bottom (schematic designator U7)
X1_CON1 "2199119-4" 2199119-4 16,46 r90 top locked (schematic designator X1)
X1_CON2 "2199119-4" 2199119-4 16,16 r90 top locked (schematic designator X1)

## Footprints (in the part's own frame and the unit in brackets; to place one, negate y for a bottom-side part, rotate by r counter-clockwise, add the part's x,y. Pads: shape width x height; smd on the part's side, far side on the other; paste and mask are expansions set on the pad)
2199119-4 [mm] "CONN FEMALE 67POS 0.020 GOLD"
  rect 0.3x1.55 smd: 1(-9.25,3.775) 2(-9,-3.775) 3(-8.75,3.775) 4(-8.5,-3.775) 5(-8.25,3.775) 6(-8,-3.775) 7(-7.75,3.775) 8(-7.5,-3.775) 9(-7.25,3.775) 10(-7,-3.775) 11(-6.75,3.775) 12(-6.5,-3.775) 13(-6.25,3.775) 14(-6,-3.775) 15(-5.75,3.775) 16(-5.5,-3.775) 17(-5.25,3.775) 18(-5,-3.775) 19(-4.75,3.775) 20(-4.5,-3.775) 21(-4.25,3.775) 22(-4,-3.775) 23(-3.75,3.775) 32(-1.5,-3.775) 33(-1.25,3.775) 34(-1,-3.775) 35(-0.75,3.775) 36(-0.5,-3.775) 37(-0.25,3.775) 38(0,-3.775) 39(0.25,3.775) 40(0.5,-3.775) 41(0.75,3.775) 42(1,-3.775) 43(1.25,3.775) 44(1.5,-3.775) 45(1.75,3.775) 46(2,-3.775) 47(2.25,3.775) 48(2.5,-3.775) 49(2.75,3.775) 50(3,-3.775) 51(3.25,3.775) 52(3.5,-3.775) 53(3.75,3.775) 54(4,-3.775) 55(4.25,3.775) 56(4.5,-3.775) 57(4.75,3.775) 58(5,-3.775) 59(5.25,3.775) 60(5.5,-3.775) 61(5.75,3.775) 62(6,-3.775) 63(6.25,3.775) 64(6.5,-3.775) 65(6.75,3.775) 66(7,-3.775) 67(7.25,3.775) 68(7.5,-3.775) 69(7.75,3.775) 70(8,-3.775) 71(8.25,3.775) 72(8.5,-3.775) 73(8.75,3.775) 74(9,-3.775) 75(9.25,3.775)
  rect 1.2x2.75 smd: 76(-10.35,3) 77(10.35,3)
  round 0.5 hole 1.1 unplated mask+0.3: ""(-10,-1.5)
  round 1 hole 1.6 unplated mask+0.3: ""(10,-1.5)
  silkscreen extent -10.95,-3.75 10.95,5.37, body extent -10.95,-4.35 10.95,4.35, height 3.11
9774015243R#1 [mm] "Round Standoff Threaded M2x0.4 Steel 0.059\" (1.50mm)"
  round 5.3 hole 3: 1(0,0)
  body extent -2.17,-2.17 2.18,2.17, height 1.51
9774015243R#2 [mm] "Round Standoff Threaded M2x0.4 Steel 0.059\" (1.50mm)"
  round 4.4 hole 3: 1(0,0)
  body extent -2.17,-2.17 2.18,2.17, height 1.51
ADI-RM-10_N [mm] "SOP, 10-Leads, Body 3x3mm, Pitch 0.5mm, IPC Medium Density"
  oval 1.8x0.3 smd: 1(-2.05,1) 2(-2.05,0.5) 3(-2.05,0) 4(-2.05,-0.5) 5(-2.05,-1) 6(2.05,-1) 7(2.05,-0.5) 8(2.05,0) 9(2.05,0.5) 10(2.05,1)
  silkscreen extent -2.18,-1.55 0.75,1.82, body extent -1.55,-1.55 1.55,1.55, height 1.1
BTB-SM1-27-2V400F [mm] "Board-to-Board Connector, Vertical, 10-Row, Pitch 1.27mm, 400-Position, Female"
  round 0.64 smd: A1(24.765,-5.715) A2(23.495,-5.715) A3(22.225,-5.715) A4(20.955,-5.715) A5(19.685,-5.715) A6(18.415,-5.715) A7(17.145,-5.715) A8(15.875,-5.715) A9(14.605,-5.715) A10(13.335,-5.715) A11(12.065,-5.715) A12(10.795,-5.715) A13(9.525,-5.715) A14(8.255,-5.715) A15(6.985,-5.715) A16(5.715,-5.715) A17(4.445,-5.715) A18(3.175,-5.715) A19(1.905,-5.715) A20(0.635,-5.715) A21(-0.635,-5.715) A22(-1.905,-5.715) A23(-3.175,-5.715) A24(-4.445,-5.715) A25(-5.715,-5.715) A26(-6.985,-5.715) A27(-8.255,-5.715) A28(-9.525,-5.715) A29(-10.795,-5.715) A30(-12.065,-5.715) A31(-13.335,-5.715) A32(-14.605,-5.715) A33(-15.875,-5.715) A34(-17.145,-5.715) A35(-18.415,-5.715) A36(-19.685,-5.715) A37(-20.955,-5.715) A38(-22.225,-5.715) A39(-23.495,-5.715) A40(-24.765,-5.715) B1(24.765,-4.445) B2(23.495,-4.445) B3(22.225,-4.445) B4(20.955,-4.445) B5(19.685,-4.445) B6(18.415,-4.445) B7(17.145,-4.445) B8(15.875,-4.445) B9(14.605,-4.445) B10(13.335,-4.445) B11(12.065,-4.445) B12(10.795,-4.445) B13(9.525,-4.445) B14(8.255,-4.445) B15(6.985,-4.445) B16(5.715,-4.445) B17(4.445,-4.445) B18(3.175,-4.445) B19(1.905,-4.445) B20(0.635,-4.445) B21(-0.635,-4.445) B22(-1.905,-4.445) B23(-3.175,-4.445) B24(-4.445,-4.445) B25(-5.715,-4.445) B26(-6.985,-4.445) B27(-8.255,-4.445) B28(-9.525,-4.445) B29(-10.795,-4.445) B30(-12.065,-4.445) B31(-13.335,-4.445) B32(-14.605,-4.445) B33(-15.875,-4.445) B34(-17.145,-4.445) B35(-18.415,-4.445) B36(-19.685,-4.445) B37(-20.955,-4.445) B38(-22.225,-4.445) B39(-23.495,-4.445) B40(-24.765,-4.445) C1(24.765,-3.175) C2(23.495,-3.175) C3(22.225,-3.175) C4(20.955,-3.175) C5(19.685,-3.175) C6(18.415,-3.175) C7(17.145,-3.175) C8(15.875,-3.175) C9(14.605,-3.175) C10(13.335,-3.175) C11(12.065,-3.175) C12(10.795,-3.175) C13(9.525,-3.175) C14(8.255,-3.175) C15(6.985,-3.175) C16(5.715,-3.175) C17(4.445,-3.175) C18(3.175,-3.175) C19(1.905,-3.175) C20(0.635,-3.175) C21(-0.635,-3.175) C22(-1.905,-3.175) C23(-3.175,-3.175) C24(-4.445,-3.175) C25(-5.715,-3.175) C26(-6.985,-3.175) C27(-8.255,-3.175) C28(-9.525,-3.175) C29(-10.795,-3.175) C30(-12.065,-3.175) C31(-13.335,-3.175) C32(-14.605,-3.175) C33(-15.875,-3.175) C34(-17.145,-3.175) C35(-18.415,-3.175) C36(-19.685,-3.175) C37(-20.955,-3.175) C38(-22.225,-3.175) C39(-23.495,-3.175) C40(-24.765,-3.175) D1(24.765,-1.905) D2(23.495,-1.905) D3(22.225,-1.905) D4(20.955,-1.905) D5(19.685,-1.905) D6(18.415,-1.905) D7(17.145,-1.905) D8(15.875,-1.905) D9(14.605,-1.905) D10(13.335,-1.905) D11(12.065,-1.905) D12(10.795,-1.905) D13(9.525,-1.905) D14(8.255,-1.905) D15(6.985,-1.905) D16(5.715,-1.905) D17(4.445,-1.905) D18(3.175,-1.905) D19(1.905,-1.905) D20(0.635,-1.905) D21(-0.635,-1.905) D22(-1.905,-1.905) D23(-3.175,-1.905) D24(-4.445,-1.905) D25(-5.715,-1.905) D26(-6.985,-1.905) D27(-8.255,-1.905) D28(-9.525,-1.905) D29(-10.795,-1.905) D30(-12.065,-1.905) D31(-13.335,-1.905) D32(-14.605,-1.905) D33(-15.875,-1.905) D34(-17.145,-1.905) D35(-18.415,-1.905) D36(-19.685,-1.905) D37(-20.955,-1.905) D38(-22.225,-1.905) D39(-23.495,-1.905) D40(-24.765,-1.905) E1(24.765,-0.635) E2(23.495,-0.635) E3(22.225,-0.635) E4(20.955,-0.635) E5(19.685,-0.635) E6(18.415,-0.635) E7(17.145,-0.635) E8(15.875,-0.635) E9(14.605,-0.635) E10(13.335,-0.635) E11(12.065,-0.635) E12(10.795,-0.635) E13(9.525,-0.635) E14(8.255,-0.635) E15(6.985,-0.635) E16(5.715,-0.635) E17(4.445,-0.635) E18(3.175,-0.635) E19(1.905,-0.635) E20(0.635,-0.635) E21(-0.635,-0.635) E22(-1.905,-0.635) E23(-3.175,-0.635) E24(-4.445,-0.635) E25(-5.715,-0.635) E26(-6.985,-0.635) E27(-8.255,-0.635) E28(-9.525,-0.635) E29(-10.795,-0.635) E30(-12.065,-0.635) E31(-13.335,-0.635) E32(-14.605,-0.635) E33(-15.875,-0.635) E34(-17.145,-0.635) E35(-18.415,-0.635) E36(-19.685,-0.635) E37(-20.955,-0.635) E38(-22.225,-0.635) E39(-23.495,-0.635) E40(-24.765,-0.635) F1(24.765,0.635) F2(23.495,0.635) F3(22.225,0.635) F4(20.955,0.635) F5(19.685,0.635) F6(18.415,0.635) F7(17.145,0.635) F8(15.875,0.635) F9(14.605,0.635) F10(13.335,0.635) F11(12.065,0.635) F12(10.795,0.635) F13(9.525,0.635) F14(8.255,0.635) F15(6.985,0.635) F16(5.715,0.635) F17(4.445,0.635) F18(3.175,0.635) F19(1.905,0.635) F20(0.635,0.635) F21(-0.635,0.635) F22(-1.905,0.635) F23(-3.175,0.635) F24(-4.445,0.635) F25(-5.715,0.635) F26(-6.985,0.635) F27(-8.255,0.635) F28(-9.525,0.635) F29(-10.795,0.635) F30(-12.065,0.635) F31(-13.335,0.635) F32(-14.605,0.635) F33(-15.875,0.635) F34(-17.145,0.635) F35(-18.415,0.635) F36(-19.685,0.635) F37(-20.955,0.635) F38(-22.225,0.635) F39(-23.495,0.635) F40(-24.765,0.635) G1(24.765,1.905) G2(23.495,1.905) G3(22.225,1.905) G4(20.955,1.905) G5(19.685,1.905) G6(18.415,1.905) G7(17.145,1.905) G8(15.875,1.905) G9(14.605,1.905) G10(13.335,1.905) G11(12.065,1.905) G12(10.795,1.905) G13(9.525,1.905) G14(8.255,1.905) G15(6.985,1.905) G16(5.715,1.905) G17(4.445,1.905) G18(3.175,1.905) G19(1.905,1.905) G20(0.635,1.905) G21(-0.635,1.905) G22(-1.905,1.905) G23(-3.175,1.905) G24(-4.445,1.905) G25(-5.715,1.905) G26(-6.985,1.905) G27(-8.255,1.905) G28(-9.525,1.905) G29(-10.795,1.905) G30(-12.065,1.905) G31(-13.335,1.905) G32(-14.605,1.905) G33(-15.875,1.905) G34(-17.145,1.905) G35(-18.415,1.905) G36(-19.685,1.905) G37(-20.955,1.905) G38(-22.225,1.905) G39(-23.495,1.905) G40(-24.765,1.905) H1(24.765,3.175) H2(23.495,3.175) H3(22.225,3.175) H4(20.955,3.175) H5(19.685,3.175) H6(18.415,3.175) H7(17.145,3.175) H8(15.875,3.175) H9(14.605,3.175) H10(13.335,3.175) H11(12.065,3.175) H12(10.795,3.175) H13(9.525,3.175) H14(8.255,3.175) H15(6.985,3.175) H16(5.715,3.175) H17(4.445,3.175) H18(3.175,3.175) H19(1.905,3.175) H20(0.635,3.175) H21(-0.635,3.175) H22(-1.905,3.175) H23(-3.175,3.175) H24(-4.445,3.175) H25(-5.715,3.175) H26(-6.985,3.175) H27(-8.255,3.175) H28(-9.525,3.175) H29(-10.795,3.175) H30(-12.065,3.175) H31(-13.335,3.175) H32(-14.605,3.175) H33(-15.875,3.175) H34(-17.145,3.175) H35(-18.415,3.175) H36(-19.685,3.175) H37(-20.955,3.175) H38(-22.225,3.175) H39(-23.495,3.175) H40(-24.765,3.175) J1(24.765,4.445) J2(23.495,4.445) J3(22.225,4.445) J4(20.955,4.445) J5(19.685,4.445) J6(18.415,4.445) J7(17.145,4.445) J8(15.875,4.445) J9(14.605,4.445) J10(13.335,4.445) J11(12.065,4.445) J12(10.795,4.445) J13(9.525,4.445) J14(8.255,4.445) J15(6.985,4.445) J16(5.715,4.445) J17(4.445,4.445) J18(3.175,4.445) J19(1.905,4.445) J20(0.635,4.445) J21(-0.635,4.445) J22(-1.905,4.445) J23(-3.175,4.445) J24(-4.445,4.445) J25(-5.715,4.445) J26(-6.985,4.445) J27(-8.255,4.445) J28(-9.525,4.445) J29(-10.795,4.445) J30(-12.065,4.445) J31(-13.335,4.445) J32(-14.605,4.445) J33(-15.875,4.445) J34(-17.145,4.445) J35(-18.415,4.445) J36(-19.685,4.445) J37(-20.955,4.445) J38(-22.225,4.445) J39(-23.495,4.445) J40(-24.765,4.445) K1(24.765,5.715) K2(23.495,5.715) K3(22.225,5.715) K4(20.955,5.715) K5(19.685,5.715) K6(18.415,5.715) K7(17.145,5.715) K8(15.875,5.715) K9(14.605,5.715) K10(13.335,5.715) K11(12.065,5.715) K12(10.795,5.715) K13(9.525,5.715) K14(8.255,5.715) K15(6.985,5.715) K16(5.715,5.715) K17(4.445,5.715) K18(3.175,5.715) K19(1.905,5.715) K20(0.635,5.715) K21(-0.635,5.715) K22(-1.905,5.715) K23(-3.175,5.715) K24(-4.445,5.715) K25(-5.715,5.715) K26(-6.985,5.715) K27(-8.255,5.715) K28(-9.525,5.715) K29(-10.795,5.715) K30(-12.065,5.715) K31(-13.335,5.715) K32(-14.605,5.715) K33(-15.875,5.715) K34(-17.145,5.715) K35(-18.415,5.715) K36(-19.685,5.715) K37(-20.955,5.715) K38(-22.225,5.715) K39(-23.495,5.715) K40(-24.765,5.715)
  round 0.97 hole 1.27 unplated: MH1(-27.18,0) MH2(27.18,-3.05)
  silkscreen extent -28.73,-6.57 28.73,6.66, body extent -28.8,-6.7 28.9,6.7, height 6.77
BTB-SM1-27-2V400M [mm] "Board-to-Board Connector, Vertical, 10-Row, Pitch 1.27mm, 400-Position"
  round 0.64 smd: A1(24.765,5.715) A2(23.495,5.715) A3(22.225,5.715) A4(20.955,5.715) A5(19.685,5.715) A6(18.415,5.715) A7(17.145,5.715) A8(15.875,5.715) A9(14.605,5.715) A10(13.335,5.715) A11(12.065,5.715) A12(10.795,5.715) A13(9.525,5.715) A14(8.255,5.715) A15(6.985,5.715) A16(5.715,5.715) A17(4.445,5.715) A18(3.175,5.715) A19(1.905,5.715) A20(0.635,5.715) A21(-0.635,5.715) A22(-1.905,5.715) A23(-3.175,5.715) A24(-4.445,5.715) A25(-5.715,5.715) A26(-6.985,5.715) A27(-8.255,5.715) A28(-9.525,5.715) A29(-10.795,5.715) A30(-12.065,5.715) A31(-13.335,5.715) A32(-14.605,5.715) A33(-15.875,5.715) A34(-17.145,5.715) A35(-18.415,5.715) A36(-19.685,5.715) A37(-20.955,5.715) A38(-22.225,5.715) A39(-23.495,5.715) A40(-24.765,5.715) B1(24.765,4.445) B2(23.495,4.445) B3(22.225,4.445) B4(20.955,4.445) B5(19.685,4.445) B6(18.415,4.445) B7(17.145,4.445) B8(15.875,4.445) B9(14.605,4.445) B10(13.335,4.445) B11(12.065,4.445) B12(10.795,4.445) B13(9.525,4.445) B14(8.255,4.445) B15(6.985,4.445) B16(5.715,4.445) B17(4.445,4.445) B18(3.175,4.445) B19(1.905,4.445) B20(0.635,4.445) B21(-0.635,4.445) B22(-1.905,4.445) B23(-3.175,4.445) B24(-4.445,4.445) B25(-5.715,4.445) B26(-6.985,4.445) B27(-8.255,4.445) B28(-9.525,4.445) B29(-10.795,4.445) B30(-12.065,4.445) B31(-13.335,4.445) B32(-14.605,4.445) B33(-15.875,4.445) B34(-17.145,4.445) B35(-18.415,4.445) B36(-19.685,4.445) B37(-20.955,4.445) B38(-22.225,4.445) B39(-23.495,4.445) B40(-24.765,4.445) C1(24.765,3.175) C2(23.495,3.175) C3(22.225,3.175) C4(20.955,3.175) C5(19.685,3.175) C6(18.415,3.175) C7(17.145,3.175) C8(15.875,3.175) C9(14.605,3.175) C10(13.335,3.175) C11(12.065,3.175) C12(10.795,3.175) C13(9.525,3.175) C14(8.255,3.175) C15(6.985,3.175) C16(5.715,3.175) C17(4.445,3.175) C18(3.175,3.175) C19(1.905,3.175) C20(0.635,3.175) C21(-0.635,3.175) C22(-1.905,3.175) C23(-3.175,3.175) C24(-4.445,3.175) C25(-5.715,3.175) C26(-6.985,3.175) C27(-8.255,3.175) C28(-9.525,3.175) C29(-10.795,3.175) C30(-12.065,3.175) C31(-13.335,3.175) C32(-14.605,3.175) C33(-15.875,3.175) C34(-17.145,3.175) C35(-18.415,3.175) C36(-19.685,3.175) C37(-20.955,3.175) C38(-22.225,3.175) C39(-23.495,3.175) C40(-24.765,3.175) D1(24.765,1.905) D2(23.495,1.905) D3(22.225,1.905) D4(20.955,1.905) D5(19.685,1.905) D6(18.415,1.905) D7(17.145,1.905) D8(15.875,1.905) D9(14.605,1.905) D10(13.335,1.905) D11(12.065,1.905) D12(10.795,1.905) D13(9.525,1.905) D14(8.255,1.905) D15(6.985,1.905) D16(5.715,1.905) D17(4.445,1.905) D18(3.175,1.905) D19(1.905,1.905) D20(0.635,1.905) D21(-0.635,1.905) D22(-1.905,1.905) D23(-3.175,1.905) D24(-4.445,1.905) D25(-5.715,1.905) D26(-6.985,1.905) D27(-8.255,1.905) D28(-9.525,1.905) D29(-10.795,1.905) D30(-12.065,1.905) D31(-13.335,1.905) D32(-14.605,1.905) D33(-15.875,1.905) D34(-17.145,1.905) D35(-18.415,1.905) D36(-19.685,1.905) D37(-20.955,1.905) D38(-22.225,1.905) D39(-23.495,1.905) D40(-24.765,1.905) E1(24.765,0.635) E2(23.495,0.635) E3(22.225,0.635) E4(20.955,0.635) E5(19.685,0.635) E6(18.415,0.635) E7(17.145,0.635) E8(15.875,0.635) E9(14.605,0.635) E10(13.335,0.635) E11(12.065,0.635) E12(10.795,0.635) E13(9.525,0.635) E14(8.255,0.635) E15(6.985,0.635) E16(5.715,0.635) E17(4.445,0.635) E18(3.175,0.635) E19(1.905,0.635) E20(0.635,0.635) E21(-0.635,0.635) E22(-1.905,0.635) E23(-3.175,0.635) E24(-4.445,0.635) E25(-5.715,0.635) E26(-6.985,0.635) E27(-8.255,0.635) E28(-9.525,0.635) E29(-10.795,0.635) E30(-12.065,0.635) E31(-13.335,0.635) E32(-14.605,0.635) E33(-15.875,0.635) E34(-17.145,0.635) E35(-18.415,0.635) E36(-19.685,0.635) E37(-20.955,0.635) E38(-22.225,0.635) E39(-23.495,0.635) E40(-24.765,0.635) F1(24.765,-0.635) F2(23.495,-0.635) F3(22.225,-0.635) F4(20.955,-0.635) F5(19.685,-0.635) F6(18.415,-0.635) F7(17.145,-0.635) F8(15.875,-0.635) F9(14.605,-0.635) F10(13.335,-0.635) F11(12.065,-0.635) F12(10.795,-0.635) F13(9.525,-0.635) F14(8.255,-0.635) F15(6.985,-0.635) F16(5.715,-0.635) F17(4.445,-0.635) F18(3.175,-0.635) F19(1.905,-0.635) F20(0.635,-0.635) F21(-0.635,-0.635) F22(-1.905,-0.635) F23(-3.175,-0.635) F24(-4.445,-0.635) F25(-5.715,-0.635) F26(-6.985,-0.635) F27(-8.255,-0.635) F28(-9.525,-0.635) F29(-10.795,-0.635) F30(-12.065,-0.635) F31(-13.335,-0.635) F32(-14.605,-0.635) F33(-15.875,-0.635) F34(-17.145,-0.635) F35(-18.415,-0.635) F36(-19.685,-0.635) F37(-20.955,-0.635) F38(-22.225,-0.635) F39(-23.495,-0.635) F40(-24.765,-0.635) G1(24.765,-1.905) G2(23.495,-1.905) G3(22.225,-1.905) G4(20.955,-1.905) G5(19.685,-1.905) G6(18.415,-1.905) G7(17.145,-1.905) G8(15.875,-1.905) G9(14.605,-1.905) G10(13.335,-1.905) G11(12.065,-1.905) G12(10.795,-1.905) G13(9.525,-1.905) G14(8.255,-1.905) G15(6.985,-1.905) G16(5.715,-1.905) G17(4.445,-1.905) G18(3.175,-1.905) G19(1.905,-1.905) G20(0.635,-1.905) G21(-0.635,-1.905) G22(-1.905,-1.905) G23(-3.175,-1.905) G24(-4.445,-1.905) G25(-5.715,-1.905) G26(-6.985,-1.905) G27(-8.255,-1.905) G28(-9.525,-1.905) G29(-10.795,-1.905) G30(-12.065,-1.905) G31(-13.335,-1.905) G32(-14.605,-1.905) G33(-15.875,-1.905) G34(-17.145,-1.905) G35(-18.415,-1.905) G36(-19.685,-1.905) G37(-20.955,-1.905) G38(-22.225,-1.905) G39(-23.495,-1.905) G40(-24.765,-1.905) H1(24.765,-3.175) H2(23.495,-3.175) H3(22.225,-3.175) H4(20.955,-3.175) H5(19.685,-3.175) H6(18.415,-3.175) H7(17.145,-3.175) H8(15.875,-3.175) H9(14.605,-3.175) H10(13.335,-3.175) H11(12.065,-3.175) H12(10.795,-3.175) H13(9.525,-3.175) H14(8.255,-3.175) H15(6.985,-3.175) H16(5.715,-3.175) H17(4.445,-3.175) H18(3.175,-3.175) H19(1.905,-3.175) H20(0.635,-3.175) H21(-0.635,-3.175) H22(-1.905,-3.175) H23(-3.175,-3.175) H24(-4.445,-3.175) H25(-5.715,-3.175) H26(-6.985,-3.175) H27(-8.255,-3.175) H28(-9.525,-3.175) H29(-10.795,-3.175) H30(-12.065,-3.175) H31(-13.335,-3.175) H32(-14.605,-3.175) H33(-15.875,-3.175) H34(-17.145,-3.175) H35(-18.415,-3.175) H36(-19.685,-3.175) H37(-20.955,-3.175) H38(-22.225,-3.175) H39(-23.495,-3.175) H40(-24.765,-3.175) J1(24.765,-4.445) J2(23.495,-4.445) J3(22.225,-4.445) J4(20.955,-4.445) J5(19.685,-4.445) J6(18.415,-4.445) J7(17.145,-4.445) J8(15.875,-4.445) J9(14.605,-4.445) J10(13.335,-4.445) J11(12.065,-4.445) J12(10.795,-4.445) J13(9.525,-4.445) J14(8.255,-4.445) J15(6.985,-4.445) J16(5.715,-4.445) J17(4.445,-4.445) J18(3.175,-4.445) J19(1.905,-4.445) J20(0.635,-4.445) J21(-0.635,-4.445) J22(-1.905,-4.445) J23(-3.175,-4.445) J24(-4.445,-4.445) J25(-5.715,-4.445) J26(-6.985,-4.445) J27(-8.255,-4.445) J28(-9.525,-4.445) J29(-10.795,-4.445) J30(-12.065,-4.445) J31(-13.335,-4.445) J32(-14.605,-4.445) J33(-15.875,-4.445) J34(-17.145,-4.445) J35(-18.415,-4.445) J36(-19.685,-4.445) J37(-20.955,-4.445) J38(-22.225,-4.445) J39(-23.495,-4.445) J40(-24.765,-4.445) K1(24.765,-5.715) K2(23.495,-5.715) K3(22.225,-5.715) K4(20.955,-5.715) K5(19.685,-5.715) K6(18.415,-5.715) K7(17.145,-5.715) K8(15.875,-5.715) K9(14.605,-5.715) K10(13.335,-5.715) K11(12.065,-5.715) K12(10.795,-5.715) K13(9.525,-5.715) K14(8.255,-5.715) K15(6.985,-5.715) K16(5.715,-5.715) K17(4.445,-5.715) K18(3.175,-5.715) K19(1.905,-5.715) K20(0.635,-5.715) K21(-0.635,-5.715) K22(-1.905,-5.715) K23(-3.175,-5.715) K24(-4.445,-5.715) K25(-5.715,-5.715) K26(-6.985,-5.715) K27(-8.255,-5.715) K28(-9.525,-5.715) K29(-10.795,-5.715) K30(-12.065,-5.715) K31(-13.335,-5.715) K32(-14.605,-5.715) K33(-15.875,-5.715) K34(-17.145,-5.715) K35(-18.415,-5.715) K36(-19.685,-5.715) K37(-20.955,-5.715) K38(-22.225,-5.715) K39(-23.495,-5.715) K40(-24.765,-5.715)
  round 0.97 hole 1.27 unplated: MH1(-27.19,-3.05) MH2(27.19,0)
  silkscreen extent -27.89,-7.34 28.78,7.34, body extent -27.89,-7.34 28.78,7.34, height 7.21
CAPC0603X33X15LL03T05 [mm] "Chip Capacitor, 2-Leads, Body 0.60x0.30mm, IPC High Density"
  rect 0.36x0.32 smd: 1(-0.28,0) 2(0.28,0)
  body extent -0.32,-0.17 0.32,0.17, height 0.33
CAPC1005X60X30LL05T10 [mm] "Chip Capacitor, 2-Leads, Body 1.00x0.50mm, IPC High Density"
  rect 0.56x0.52 smd: 1(-0.38,0) 2(0.38,0)
  body extent -0.53,-0.28 0.53,0.28, height 0.6
CAPC1050X55X23LL05T13 [mm] "Chip Capacitor, 2-Leads, Body 1.05x0.55mm, IPC High Density"
  rect 0.56x0.52 smd: 1(-0.39,0) 2(0.39,0)
  body extent -0.53,-0.28 0.53,0.28, height 0.55
CAPC1608X90X35LL15T15 [mm] "Chip Capacitor, 2-Leads, Body 1.60x0.81mm, IPC High Density"
  rect 0.85x0.9 smd: 1(-0.65,0) 2(0.65,0)
  body extent -0.88,-0.48 0.87,0.48, height 0.9
FBGA24_A-130 [mm] "BGA, 24-Balls, Body 8x6mm, Pitch 1mm, A1 missing"
  round 0.35 smd: A2(-1,2) A3(0,2) A4(1,2) A5(2,2) B1(-2,1) B2(-1,1) B3(0,1) B4(1,1) B5(2,1) C1(-2,0) C2(-1,0) C3(0,0) C4(1,0) C5(2,0) D1(-2,-1) D2(-1,-1) D3(0,-1) D4(1,-1) D5(2,-1) E1(-2,-2) E2(-1,-2) E3(0,-2) E4(1,-2) E5(2,-2)
  silkscreen extent -3.77,-4 3,4, body extent -3,-4 3,4, height 1.3
FP-HCLGA-DM00231908-MFG [mm]
  rect 0.4x0.95 smd paste+0 mask+0: 1(-0.425,0.675) 2(-0.425,-0.675) 3(0.425,-0.675) 4(0.425,0.675)
  rect 0.35x2.3 smd paste+0 mask+0: 5(-1.225,0) 5(1.225,0)
  rect 1.3x0.35 smd paste+0 mask+0: 5(0,1.725) 5(0,-1.725)
  silkscreen extent -1.55,-2.05 1.55,2.62, body extent -2.05,-2.55 2.05,2.55, height 0.25
M08A_N [mm] "SOIC, 8-Leads, Body 4.9x3.9mm, Pitch 1.27mm, IPC Medium Density"
  oval 2.2x0.6 smd: 1(-2.4,1.905) 2(-2.4,0.635) 3(-2.4,-0.635) 4(-2.4,-1.905) 5(2.4,-1.905) 6(2.4,-0.635) 7(2.4,0.635) 8(2.4,1.905)
  silkscreen extent -2.53,-2.5 0.9,2.88, body extent -2,-2.5 2,2.5, height 1.75
MM8430-2610 [mm] "SWD Connector Receptacle, Female Socket 50Ohm Surface Mount Solder"
  rect 0.5x1 smd paste-1: 1(-1.8,0) 2(1.8,0)
  rect 1x1 smd paste-1: 3(-1,-1.5) 4(1,-1.5) 5(1,1.5) 6(-1,1.5)
  Top Layer region: 1.575,-0.275 1.076,-0.275 1.076,0.275 1.575,0.275
  Top Layer region: -1.075,-0.275 -1.577,-0.275 -1.577,0.275 -1.075,0.275
  silkscreen extent -2.9,-2.25 2.25,2.25, body extent -1.5,-1.5 1.5,1.5, height 1.91
RESC0603X26X15LL03T05 [mm] "Chip Resistor, 2-Leads, Body 0.60x0.30mm, IPC High Density"
  rect 0.35x0.25 smd: 1(-0.275,0) 2(0.275,0)
  body extent -0.32,-0.16 0.31,0.17, height 0.26
RESC0603X28X15ML05T05 [mm] "Chip Resistor, 2-Leads, Body 0.60x0.30mm, IPC Low Density"
  rect 0.55x0.45 smd: 1(-0.375,0) 2(0.375,0)
  body extent -0.33,-0.17 0.33,0.18, height 0.28
RESC1005X40X25LL05T10 [mm] "Chip Resistor, 2-Leads, Body 1.00x0.50mm, IPC High Density"
  rect 0.5x0.45 smd: 1(-0.375,0) 2(0.375,0)
  body extent -0.53,-0.27 0.53,0.28, height 0.4
RESC1005X40X25LL10T10 [mm] "Chip Resistor, 2-Leads, Body 1.00x0.50mm, IPC High Density"
  rect 0.55x0.5 smd: 1(-0.375,0) 2(0.375,0)
  body extent -0.55,-0.3 0.55,0.3, height 0.4
RESC3116X65X40NL10T20 [mm] "Chip Resistor, 2-Leads, Body 3.10x1.60mm, IPC Medium Density"
  rect 1.05x1.7 smd: 1(-1.425,0) 2(1.425,0)
  silkscreen extent -0.5,-0.75 0.5,0.75, body extent -1.6,-0.85 1.6,0.85, height 0.65
SOIC127P1030X265-16N [mm] "SOIC, 16-Leads, Body 10.3x7.5mm, Pitch 1.27mm, IPC Medium Density"
  oval 2.1x0.6 smd: 1(-4.575,4.445) 2(-4.575,3.175) 3(-4.575,1.905) 4(-4.575,0.635) 5(-4.575,-0.635) 6(-4.575,-1.905) 7(-4.575,-3.175) 8(-4.575,-4.445) 9(4.575,-4.445) 10(4.575,-3.175) 11(4.575,-1.905) 12(4.575,-0.635) 13(4.575,0.635) 14(4.575,1.905) 15(4.575,3.175) 16(4.575,4.445)
  silkscreen extent -3.13,-5.15 3.13,5.15, body extent -5.15,-5.25 5.15,5.25, height 2.65